# Altium PCB PCB_LogNController-v1.1.PcbDoc (part 1 of 3)
Units mil, origin at the board's own origin, x right, y up, seen from the top; angles counter-clockwise.
Board outline 7018 x 7081 mil, 2 copper layers (Top Layer, Bottom Layer), stack 61.811 mil thick; 172 components, 114 nets, 574 pads, 361 vias.
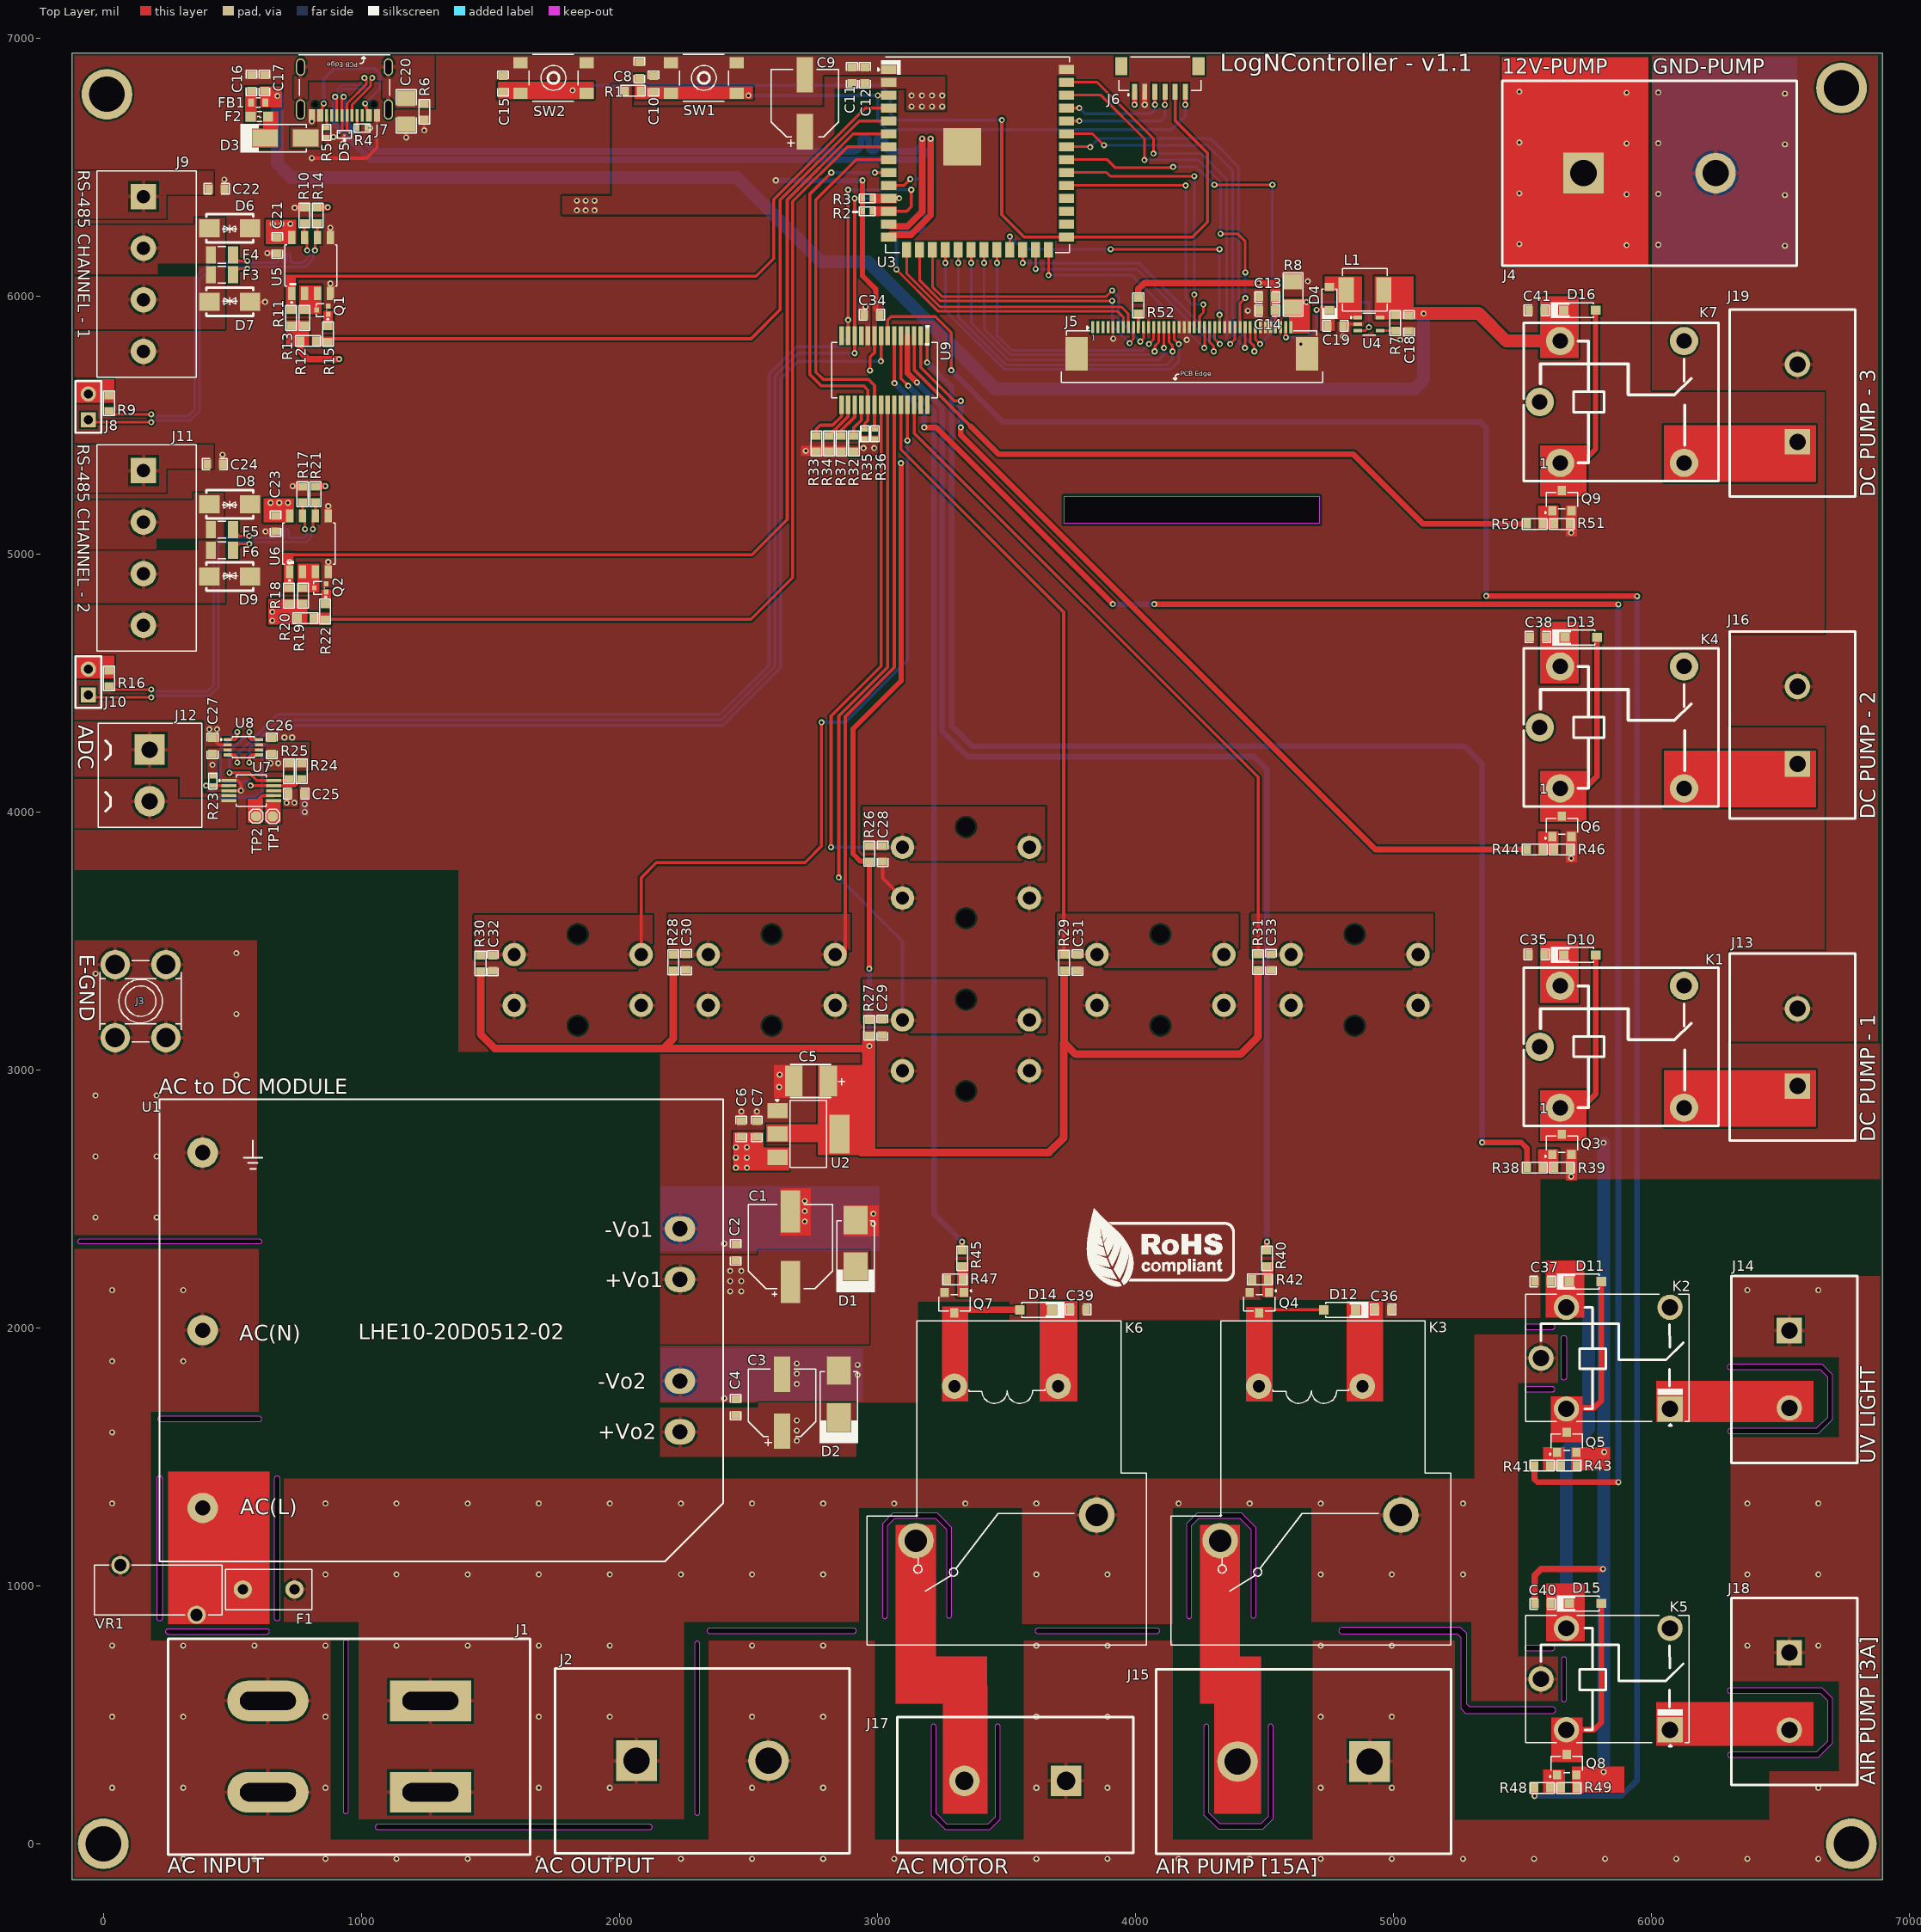
[diagram p0: Top Layer view]
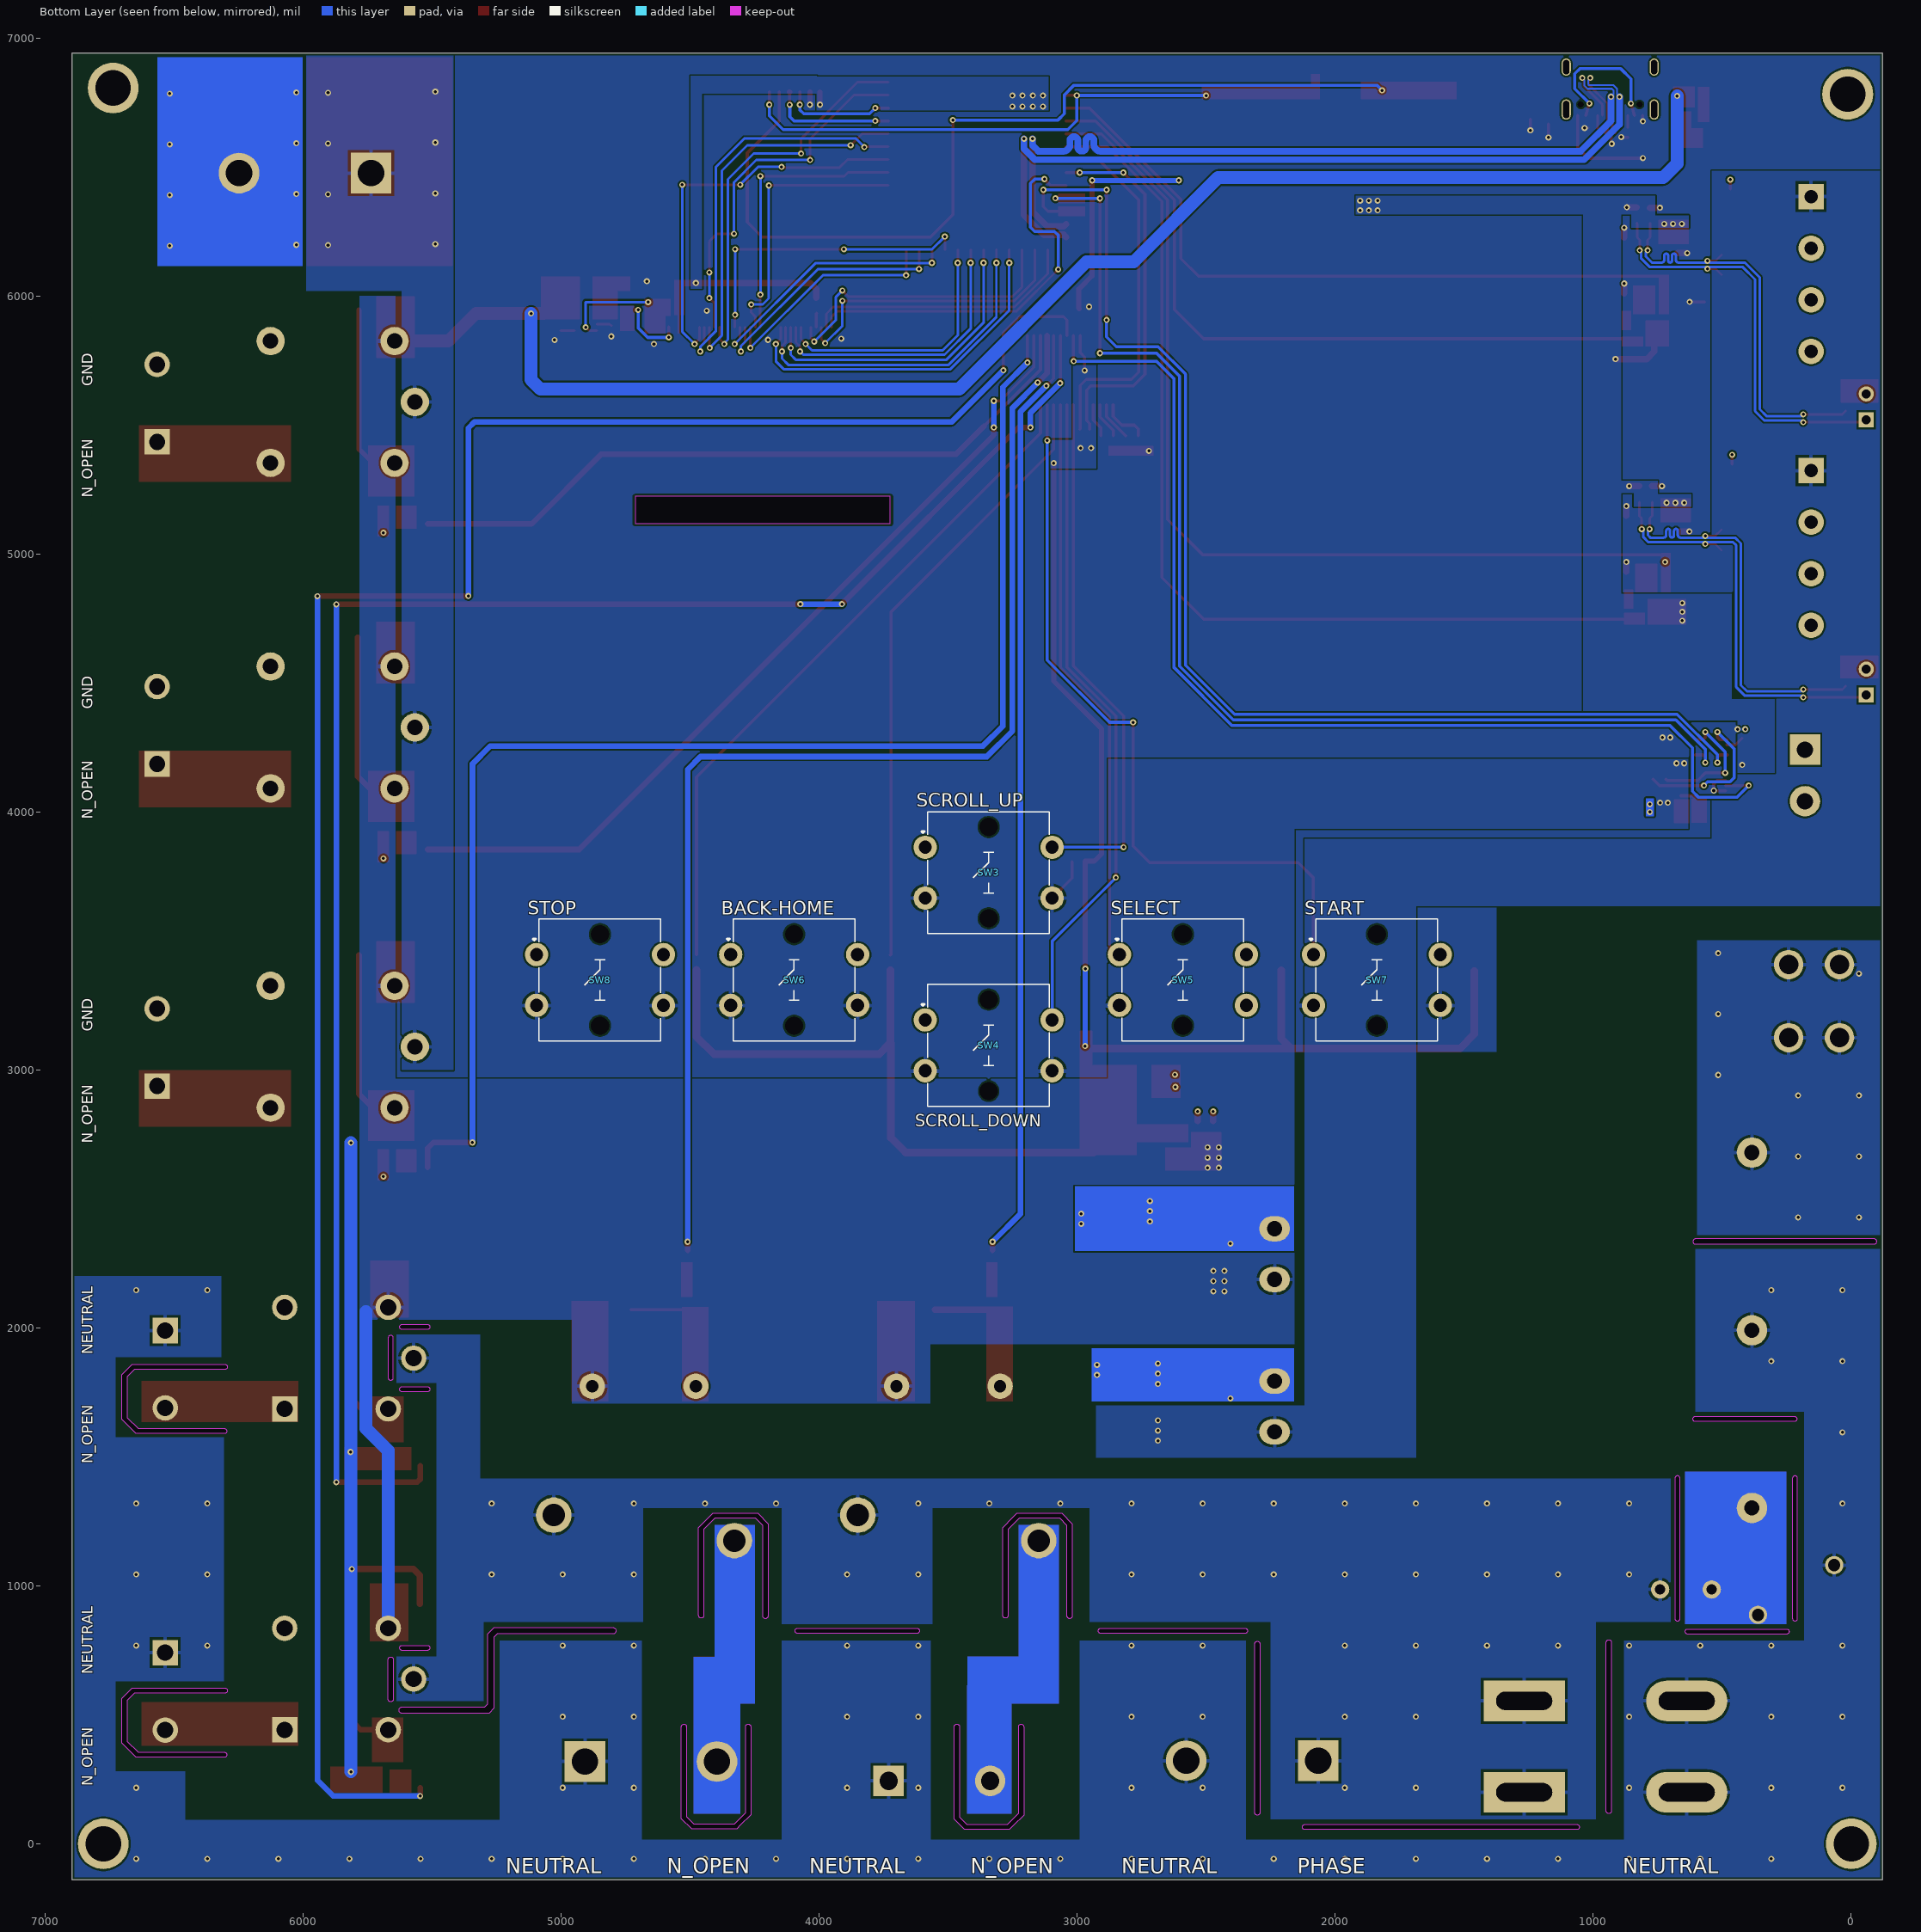
[diagram p1: Bottom Layer view, seen from below]
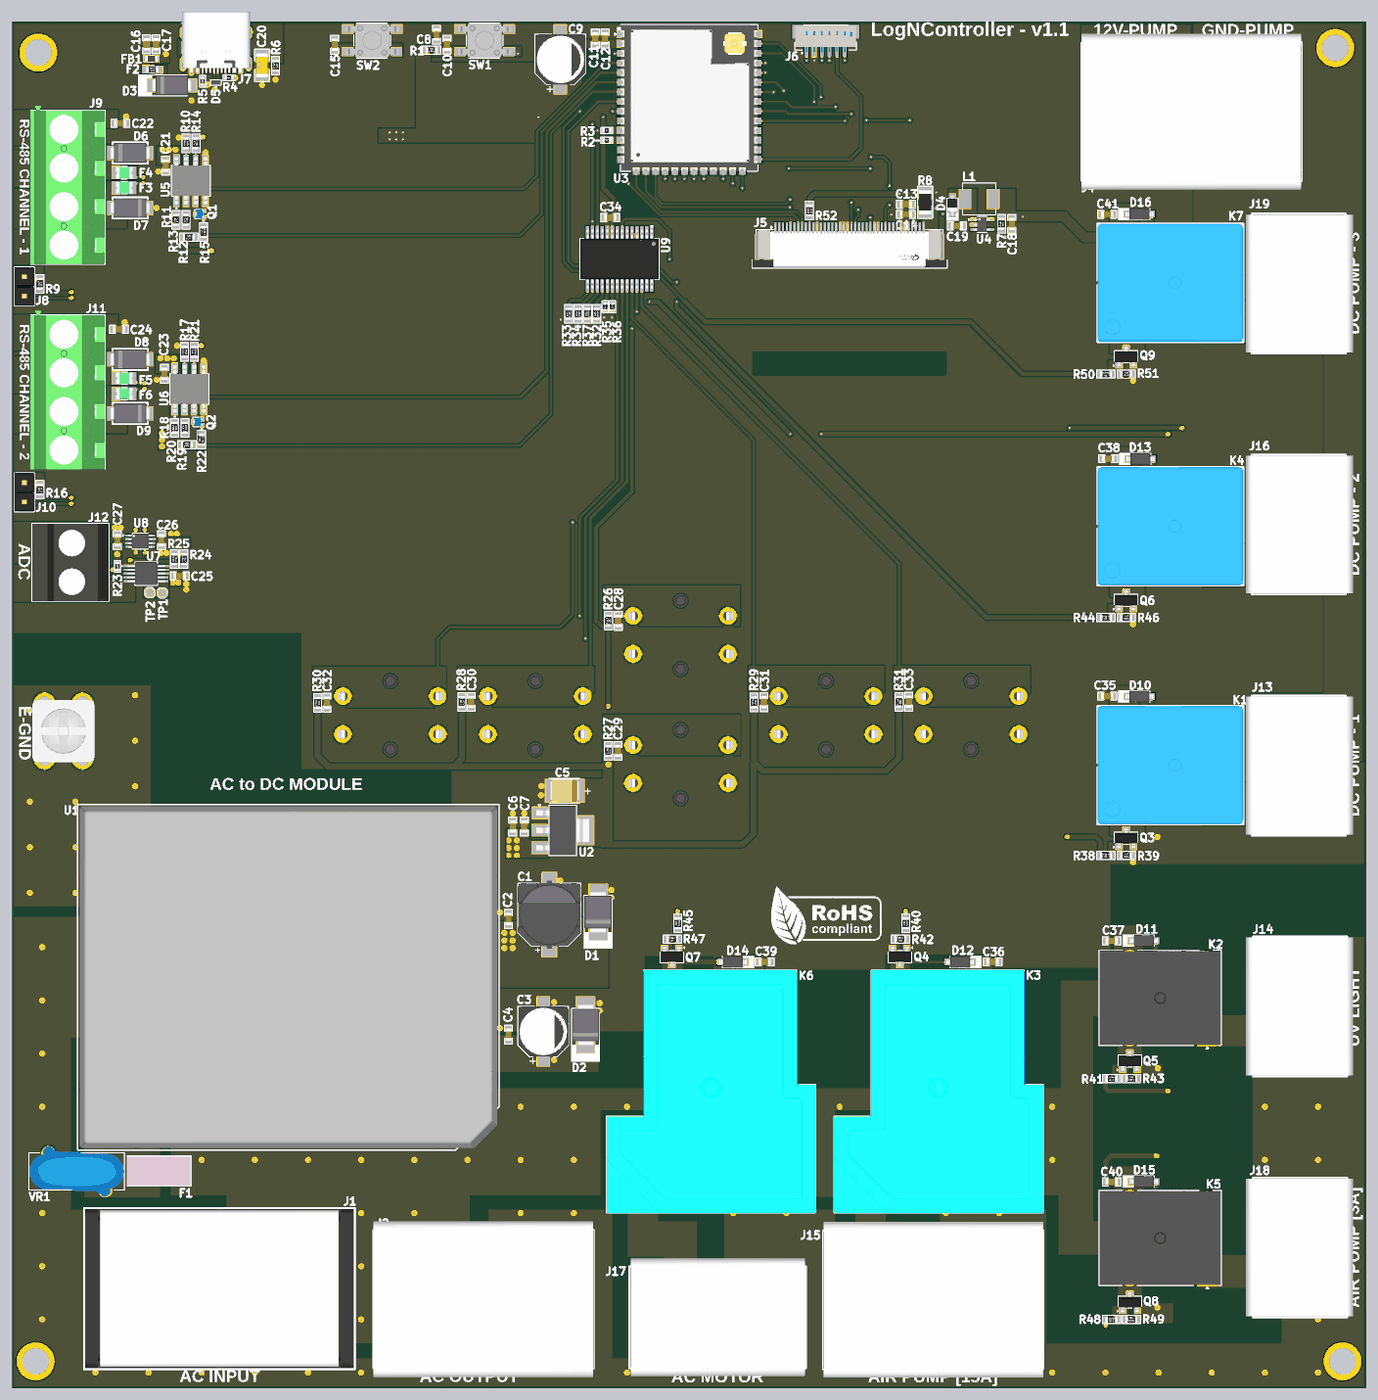
[diagram p3: 3D render of the assembled board from above, using the file's embedded part models]
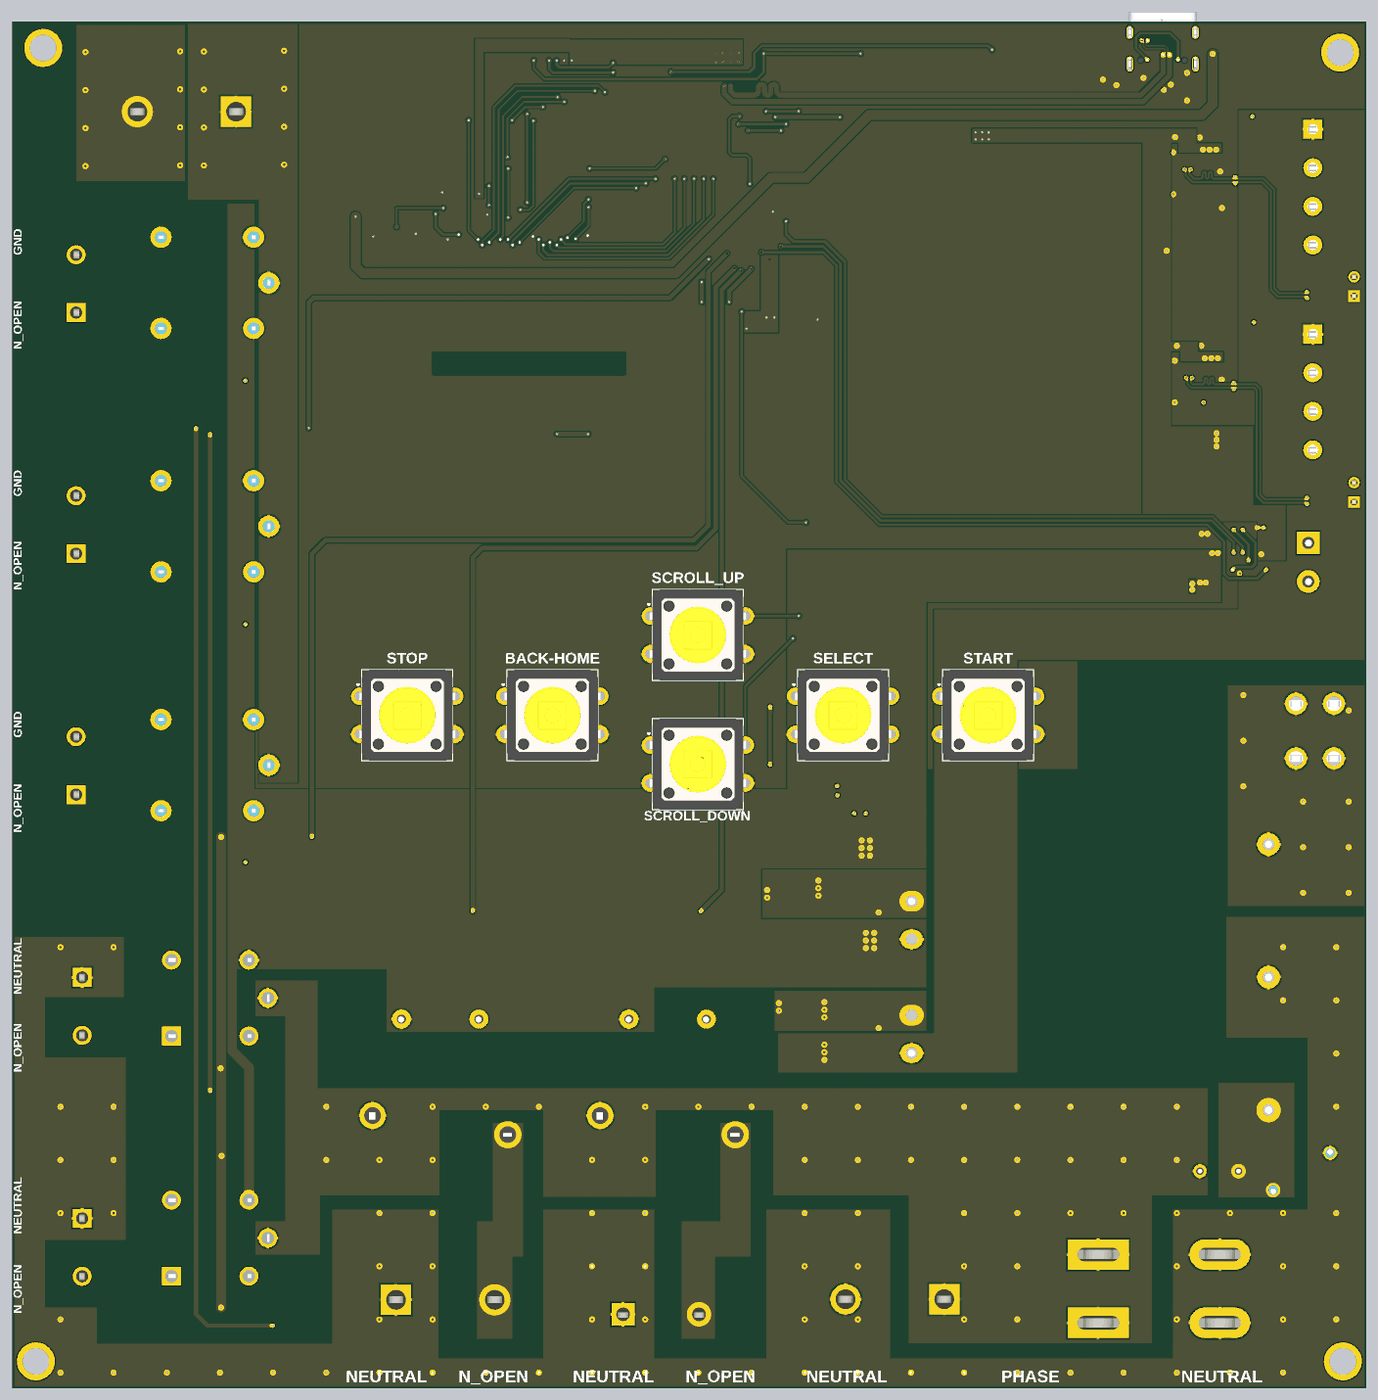
[diagram p4: 3D render of the assembled board from below, using the file's embedded part models]

## Layer stack, top to bottom
Top Solder: solder mask 0.394, Solder Resist, Dk 3.5
Top Layer: signal copper 1.378
Dielectric 1: core 59.055, FR-4, Dk 4.8
Bottom Layer: signal copper 1.378
Bottom Solder: solder mask 0.394, Solder Resist, Dk 3.5

## Board outline
-121,-139 6897,-139 6897,6942 -121,6942
cut-out: 2340.52,825.82 ccw(c2350.52,825.82) 2350.52,815.82 2909,815.82 ccw(c2909,825.82) 2919,825.82 ccw(c2909,825.82) 2909,835.82 2350.52,835.82 ccw(c2350.52,825.82)
cut-out: 218.15,863.91 cw(c218.15,873.91) 208.15,873.91 208.15,1416.7 cw(c218.15,1416.7) 218.15,1426.7 cw(c218.15,1416.7) 228.15,1416.7 228.15,873.91 cw(c218.15,873.91)
cut-out: 3020,883 ccw(c3030,883) 3030,873 ccw(c3030,883) 3040,883 3039.84,883 3039.84,1233.52 3067.89,1261.57 3226.04,1261.57 3268.84,1218.76 3268.84,885 ccw(c3278.84,885) 3278.84,875 ccw(c3278.84,885) 3288.84,885 3288.84,1226.29 3248.33,1266.8 3233.57,1281.57 3060.35,1281.57 3019.84,1241.05
cut-out: 3228.16,118.24 3228.16,454 ccw(c3218.16,454) 3218.16,464 ccw(c3218.16,454) 3208.16,454 3208.16,110.71 3248.67,70.2 3263.43,55.43 3436.65,55.43 3477.16,95.95 3477.16,454 3477,454 ccw(c3467,454) 3467,464 ccw(c3467,454) 3457,454 3457.16,454 3457.16,103.48 3429.11,75.43 3270.96,75.43
cut-out: 4286.16,120.24 4286.16,454 ccw(c4276.16,454) 4276.16,464 ccw(c4276.16,454) 4266.16,454 4266.16,112.71 4306.67,72.2 4321.43,57.43 4494.65,57.43 4535.16,97.95 4535.16,456 4535,454 ccw(c4525,454) 4525,464 ccw(c4525,454) 4515,454 4515.16,456 4515.16,105.48 4487.11,77.43 4328.96,77.43
cut-out: 4199.39,883 ccw(c4209.39,883) 4209.39,873 ccw(c4209.39,883) 4219.39,883 4219.23,883 4219.23,1233.52 4247.28,1261.57 4405.43,1261.57 4448.23,1218.76 4448.23,885 ccw(c4458.23,885) 4458.23,875 ccw(c4458.23,885) 4468.23,885 4468.23,1226.29 4427.72,1266.8 4412.96,1281.57 4239.74,1281.57 4199.23,1241.05
cut-out: 5510.09,2003.79 ccw(c5520.09,2003.79) 5520.09,1993.79 5617.94,1993.79 5617.31,1993.81 ccw(c5617.31,2003.77) 5627.28,2003.77 5627.28,2003.8 ccw(c5617.31,2003.8) 5617.31,2013.77 5617.94,2013.94 5520.09,2013.94 5520.09,2013.79 ccw(c5520.09,2003.79)
cut-out: 673.85,863.91 cw(c673.85,873.91) 663.85,873.91 663.85,1416.7 cw(c673.85,1416.7) 673.85,1426.7 cw(c673.85,1416.7) 683.85,1416.7 683.85,873.91 cw(c673.85,873.91)
cut-out: 5510.09,759.62 ccw(c5520.09,759.62) 5520.09,749.62 5617.94,749.62 5617.31,749.64 ccw(c5617.31,759.61) 5627.28,759.61 5627.28,759.64 ccw(c5617.31,759.64) 5617.31,769.6 5617.94,769.77 5520.09,769.77 5520.09,769.62 ccw(c5520.09,759.62)
cut-out: 5520.09,1752.09 5617.94,1752.09 5617.31,1752.26 ccw(c5617.31,1762.23) 5627.28,1762.23 5627.28,1762.26 ccw(c5617.31,1762.26) 5617.31,1772.22 5617.94,1772.24 5520.09,1772.24 ccw(c5520.09,1762.24) 5510.09,1762.24 ccw(c5520.09,1762.24)
cut-out: 6297.24,345.16 ccw(c6307.24,345.16) 6307.24,335.16 6648.53,335.16 6689.04,375.67 6703.8,390.43 6703.8,563.65 6663.29,604.16 6305.24,604.16 6305.24,604 ccw(c6305.24,594) 6295.24,594 ccw(c6305.24,594) 6305.24,584 6305.24,584.16 6655.76,584.16 6683.8,556.12 6683.8,397.96 6641,355.16 6307.24,355.16 ccw(c6307.24,345.16)
cut-out: 6297.24,1600 ccw(c6307.24,1600) 6307.24,1590 6648.53,1590 6689.04,1630.51 6703.8,1645.27 6703.8,1818.49 6663.29,1859 6305.24,1859 6305.24,1858.84 ccw(c6305.24,1848.84) 6295.24,1848.84 ccw(c6305.24,1848.84) 6305.24,1838.84 6305.24,1839 6655.76,1839 6683.8,1810.96 6683.8,1652.8 6641,1610 6307.24,1610 ccw(c6307.24,1600)
cut-out: 5249.01,813.3 5261.53,800.78 5261.53,526.82 5262.27,525.04 5281.16,506.15 5282.94,505.41 5617.94,505.41 5619.14,505.72 ccw(c5617.31,518.06) 5629.79,518.06 5629.79,518.09 ccw(c5617.31,518.09) 5618.59,530.51 5617.94,530.59 5296.83,530.59 5285.31,542.12 5285.31,813.82 5284.57,815.6 5262.57,837.6 5260.79,838.33 4801.56,838.33 ccw(c4801.56,825.82) 4789.05,825.82 ccw(c4801.56,825.82) 4801.56,813.3
cut-out: 3612.17,825.82 ccw(c3622.17,825.82) 3622.17,815.82 4084.66,815.82 ccw(c4084.66,825.82) 4094.66,825.82 ccw(c4084.66,825.82) 4084.66,835.82 3622.17,835.82 ccw(c3622.17,825.82)
cut-out: 2292.44,121.12 ccw(c2302.44,121.12) 2302.44,111.12 ccw(c2302.44,121.12) 2312.44,121.12 2312.44,775.16 ccw(c2302.44,775.16) 2302.44,785.16 ccw(c2302.44,775.16) 2292.44,775.16
cut-out: 1054,65 ccw(c1064,65) 1064,55 2118.05,55 ccw(c2118.05,65) 2128.05,65 ccw(c2118.05,65) 2118.05,75 1064,75 ccw(c1064,65)
cut-out: 930,127.12 ccw(c940,127.12) 940,117.12 ccw(c940,127.12) 950,127.12 950,781.17 ccw(c940,781.17) 940,791.17 ccw(c940,781.17) 930,781.17
cut-out: 251,813 634,813 ccw(c634,823) 644,823 ccw(c634,823) 634,833 251,833 ccw(c251,823) 241,823 ccw(c251,823)
cut-out: 221,1637 604,1637 ccw(c604,1647) 614,1647 ccw(c604,1647) 604,1657 221,1657 ccw(c221,1647) 211,1647 ccw(c221,1647)
cut-out: -89,2325 cw(c-89,2335) -99,2335 cw(c-89,2335) -89,2345 604,2345 cw(c604,2335) 614,2335 cw(c604,2335) 604,2325
cut-out: 5651.94,560.48 ccw(c5661.94,560.48) 5661.94,550.48 ccw(c5661.94,560.48) 5671.94,560.48 5671.94,714.53 ccw(c5661.94,714.53) 5661.94,724.53 ccw(c5661.94,714.53) 5651.94,714.53
cut-out: 5671.94,1807.34 cw(c5661.94,1807.34) 5661.94,1797.34 cw(c5661.94,1807.34) 5651.94,1807.34 5651.94,1961.39 cw(c5661.94,1961.39) 5661.94,1971.39 cw(c5661.94,1961.39) 5671.94,1961.39
cut-out: 3725.03,5118.5 3725.03,5223.5 4714,5223.5 4714,5118.5

## Design rules (kind name [scope] priority, off if disabled: settings)
BoardOutlineClearance [All] p1: gap=0 ignorepadtopadclearanceinfootprint=FALSE except(10: Via-OutlineEdge Fill-OutlineEdge Fill-CutoutEdge Poly-OutlineEdge Poly-CutoutEdge Region-OutlineEdge Region-CutoutEdge)
Clearance [All] p1: gap=7 ignorepadtopadclearanceinfootprint=FALSE except(0: SMDPad-THPad SMDPad-Hole; 4: Arc-SMDPad Track-SMDPad SMDPad-SMDPad)
ComponentClearance [All] p1: gap=5 collisioncheckmode=3 verticalgap=5 showdistances=FALSE
DiffPairsRouting DiffPairsRouting_RS485 [InDifferentialPairClass('RS485_Lines')] p1: maxlimit=8 minlimit=8 mostfreqgap=8 toplayer_minwidth=10 toplayer_maxwidth=10 toplayer_prefwidth=10 bottomlayer_minwidth=10 bottomlayer_maxwidth=10 bottomlayer_prefwidth=10 impedanceprofiledriven=TRUE impedanceprofileid={C0F69817-CA74-47E5-B65F-B62474643589} impedanceprofilevalue=120.000000 maxuncoupledlength=500
DiffPairsRouting [InDifferentialPairClass('USB_PROGRAM_LINES')] p2: maxlimit=7 minlimit=7 mostfreqgap=7 toplayer_minwidth=7 toplayer_maxwidth=26 toplayer_prefwidth=26 bottomlayer_minwidth=7 bottomlayer_maxwidth=26 bottomlayer_prefwidth=26 impedanceprofiledriven=TRUE impedanceprofileid={13F691BD-BDFD-4AD8-8890-2CF89E266969} impedanceprofilevalue=90.000000 maxuncoupledlength=500
Height [All] p1: minheight=0 maxheight=2000 prefheight=500
HoleSize [All] p1: absolutevalues=TRUE maxlimit=10000 minlimit=1 maxpercent=80.000 minpercent=20.000
HoleToHoleClearance [All] p1: gap=2 allowstackedmicrovias=TRUE
MatchedLengths "Schematic Matched Net Lengths_1" [InNetClass('RS485')] p1: tolerance=50 checknetsindiffpair=TRUE checkdiffpairvsdiffpair=FALSE checkxsignals=FALSE checkothers=FALSE
MatchedLengths "Schematic Matched Net Lengths" [InNetClass('USB_PROGRAM')] p2: tolerance=50 checknetsindiffpair=TRUE checkdiffpairvsdiffpair=FALSE checkxsignals=FALSE checkothers=FALSE
MaxMinImpedance "Schematic Impedance Constraint_1" [InNetClass('RS485')] p1: minimum=120.0 maximum=120.0
MaxMinImpedance "Schematic Impedance Constraint" [InNetClass('USB_PROGRAM')] p2: minimum=85.00 maximum=90.00
MinimumSolderMaskSliver [All] p1: minsoldermaskwidth=0
PolygonConnect [All] p1: thpad.connectstyle=Relief thpad.reliefconductorwidth=15 thpad.reliefentries=4 thpad.polygonreliefangle="90 Angle" thpad.airgapwidth=10 smdpad.connectstyle=Direct smdpad.reliefconductorwidth=10 smdpad.reliefentries=4 smdpad.polygonreliefangle="90 Angle" smdpad.airgapwidth=10 via.connectstyle=Direct via.reliefconductorwidth=10 via.reliefentries=4 via.polygonreliefangle="90 Angle" via.airgapwidth=10
RoutingVias [All] p1: holewidth=11.81 width=23.62 viastyle="Through Hole" minholewidth=11.81 minwidth=23.62 maxholewidth=11.81 maxwidth=23.62
SilkToSilkClearance [All] p1: silktosilkclearance=0
SilkToSolderMaskClearance [IsPad] p1: minsilkscreentomaskgap=0 clearancetoexposedcopper=TRUE
SolderMaskExpansion [All] p1: expansion=4 istentingtop=FALSE
UnRoutedNet [All] p1: checkbadconnections=TRUE
Width [All] p1: maxlimit=100 minlimit=10 preferedwidth=15 minimp=50.000000 maximp=50.000000 favimp=50.000000
21 further rules are at their usual default settings.

## Classes and differential pairs
differential pair class RS485_Lines: RS485-1 RS485-2
net class RS485: RS485-1_N RS485-1_P RS485-2_N RS485-2_P
differential pair class USB_PROGRAM_LINES: USB_D
net class USB_PROGRAM: USB_D_N USB_D_P
component class U_Sensor-Comms-Sheet: C21 C22 C23 C24 D6 D7 D8 D9 F3 F4 F5 F6 J8 J9 J10 J11 Q1 Q2 R9 R10 R11 R12 R13 R14 R15 R16 R17 R18 R19 R20 R21 R22 U5 U6
component class U_Relay-Sheet: C35 C36 C37 C38 C39 C40 C41 D10 D11 D12 D13 D14 D15 D16 J13 J14 J15 J16 J17 J18 J19 K1 K2 K3 K4 K5 K6 K7 Q3 Q4 Q5 Q6 Q7 Q8 Q9 R38 R39 R40 R41 R42 R43 R44 R45 R46 R47 R48 R49 R50 R51
component class U_Power-Sheet: C1 C2 C3 C4 C5 C6 C7 D1 D2 F1 J1 J2 J3 J4 U1 U2 VR1
component class U_IO-Expander-Sheet: C34 R32 R33 R34 R35 R36 R37 U9
component class U_Controller-Sheet: C8 C9 C10 C11 C12 C13 C14 C15 C16 C17 C18 C19 C20 D3 D4 D5 F2 FB1 J5 J6 J7 L1 R1 R2 R3 R4 R5 R6 R7 R8 R52 SW1 SW2 U3 U4
component class U_Buttons-Sheet: C28 C29 C30 C31 C32 C33 R26 R27 R28 R29 R30 R31 SW3 SW4 SW5 SW6 SW7 SW8
component class U_ADC-Sheet: C25 C26 C27 J12 R23 R24 R25 TP1 TP2 U7 U8
differential pair RS485-2: +RS485-2_P -RS485-2_N
differential pair RS485-1: +RS485-1_P -RS485-1_N
differential pair USB_D: +USB_D_P -USB_D_N

## Components (designator, comment, footprint, x,y, rotation, side; value= is the part's Value field where it differs from the comment)
C1 "100uF" 25SVPF100M. 2663.76,2315.17 r90 top locked
C2 "100nF" Cap-0603 2451.37,2293 r270 top locked
C3 "47uF" RVT1H470M0607 2631.37,1710.09 r90 top locked
C4 "100nF" Cap-0603 2451.37,1693 r270 top locked
C5 "22uF" Case-B 2743.37,2957 r180 top locked
C6 "22uF" Cap-0603 2473.37,2772 r270 top locked
C7 "100nF" Cap-0603 2533.37,2772 r270 top locked
C8 "1uF" Cap-0603 2078,6876 r270 top locked
C9 "47uF" RVT1H470M0607 2720,6748 r90 top locked
C10 "100nF" Cap-0603 2133,6824 r90 top locked
C11 "22uF" Cap-0603 2902,6856 r270 top locked
C12 "100nF" Cap-0603 2952,6856 r270 top locked
C13 "4.7uF" Cap-0603 4512,5997 r0 top locked
C14 "100nF" Cap-0603 4512,5944 r0 top locked
C15 "100nF" Cap-0603 1550,6824 r90 top locked
C16 "100nF" Cap-0603 575,6826 r270 top locked
C17 "100nF" Cap-0603 625,6826 r270 top locked
C18 "4.7uF" Cap-0603 5061,5894.74 r90 top locked
C19 "1uF" Cap-0603 4776,5884.74 r180 top locked
C20 "4.7nF" Cap-1206 1174,6717 r90 top locked
C21 "100nF" Cap-0603 674,6197 r270 top locked
C22 "100nF" Cap-0603 439,6416 r180 top locked
C23 "100nF" Cap-0603 668,5118 r270 top locked
C24 "100nF" Cap-0603 432,5349 r180 top locked
C25 "100nF" Cap-0603 747.51,4071 r180 top locked
C26 "100nF" Cap-0603 652.51,4256 r90 top locked
C27 "100nF" Cap-0603 423.51,4256 r90 top locked
C28 "100nF" Cap-0603 3021,3838 r270 top locked
C29 "100nF" Cap-0603 3019,3164 r270 top locked
C30 "100nF" Cap-0603 2259,3418 r270 top locked
C31 "100nF" Cap-0603 3776,3417 r270 top locked
C32 "100nF" Cap-0603 1510,3414 r270 top locked
C33 "100nF" Cap-0603 4526.67,3419 r270 top locked
C34 "100nF" Cap-0603 2979,5928 r180 top locked
C35 "100nF" Cap-0603 5556,3447.87 r180 top locked
C36 "100nF" Cap-0603 4961,2071 r0 top locked
C37 "100nF" Cap-0603 5579,2179.87 r180 top locked
C38 "100nF" Cap-0603 5561,4678.87 r180 top locked
C39 "100nF" Cap-0603 3780,2071 r0 top locked
C40 "100nF" Cap-0603 5579,930 r180 top locked
C41 "100nF" Cap-0603 5556,5944.87 r180 top locked
D1 "SMBJ7.0A" SMB_ 2916.37,2328 r270 top locked
D2 "SMBJ20A" SMB_ 2851.37,1743.55 r270 top locked
D3 "SS24A" SMA 705.74,6613 r0 top locked
D4 "NSR0240HT1G" SOD-323 4753,5990.74 r90 top locked value=4pF
D5 "ESD122DMYR" X2-SON-3(0.6x1.3). 934.68,6628.08 r90 top locked
D6 "SMAJ12CA" "SMA Bi Directional" 490,6263 r0 top locked
D7 "SMAJ12CA" "SMA Bi Directional" 490,5978 r180 top locked
D8 "SMAJ12CA" "SMA Bi Directional" 490,5193 r0 top locked
D9 "SMAJ12CA" "SMA Bi Directional" 490,4913 r180 top locked
D10 "1N4148W-7-F" SOD-123 5722.99,3445.87 r180 top locked value=2pF
D11 "1N4148W-7-F" SOD-123 5745,2179.87 r180 top locked value=2pF
D12 "1N4148W-7-F" SOD-123 4792.86,2070 r0 top locked value=2pF
D13 "1N4148W-7-F" SOD-123 5727.99,4676.87 r180 top locked value=2pF
D14 "1N4148W-7-F" SOD-123 3614.87,2070 r0 top locked value=2pF
D15 "1N4148W-7-F" SOD-123 5745.03,932 r180 top locked value=2pF
D16 "1N4148W-7-F" SOD-123 5722.99,5945.87 r180 top locked value=2pF
F1 "2010T1A250V" 2010T1A250V 641,986 r180 top locked
F2 "BSMD0603L-100" fuse-0603 605,6696 r180 top locked
F3 "SMD0805P020TF" Fuse-0805 460,6160 r180 top locked
F4 "SMD0805P020TF" Fuse-0805 460,6083 r180 top locked
F5 "SMD0805P020TF" Fuse-0805 460,5095 r180 top locked
F6 "SMD0805P020TF" Fuse-0805 460,5015 r180 top locked
FB1 "BLM18SG121TN1D" "IND-0603 (1608 Metric)" 600,6751 r0 top locked
J1 "KF88SA-16.0-2P" KF88SA-16.0-2P 953,377 r180 top locked
J2 "KF78C-13.0-2P" KF78C-13.0-2P 2322.49,322.16 r0 top locked
J3 "T44001" T44001 144.43,3267 r0 top locked
J4 "KF78C-13.0-2P" KF78C-13.0-2P 5994,6477 r0 top locked
J5 "AFC07-S40ECA-00" AFC07-S40ECA-00 4219.51,5828.48 r0 top locked
J6 "Voltlink Target" "Voltlink Target" 4096,6842 r0 top locked
J7 "TYPE-C-31-M-12" TYPE-C-31-M-12_ 934.72,6794.49 r180 top locked
J8 "X6511WV-02H-C60D30" HDR1X2_ -58,5521 r90 top locked
J9 "1715747" 1715747 155.71,6086 r270 top locked
J10 "X6511WV-02H-C60D30" HDR1X2_ -58,4454 r90 top locked
J11 "1715747" 1715747 155.71,5024 r270 top locked
J12 "DB128L-5.08-2P-BK-S" DB128L-5.08-2P-BK-S 179.51,4142 r270 top locked
J13 "KF28C-7.62-2P" KF28C-7.62-2P 6567.5,3087.68 r90 top locked
J14 "KF28C-7.62-2P" KF28C-7.62-2P 6536,1839.84 r270 top locked
J15 "KF78C-13.0-2P" KF78C-13.0-2P 4652.87,319 r180 top locked
J16 "KF28C-7.62-2P" KF28C-7.62-2P 6567.5,4336.52 r90 top locked
J17 "KF58C-10.0-2P" KF58C-10.0-2P 3535,244 r180 top locked
J18 "KF28C-7.62-2P" KF28C-7.62-2P 6536,591 r270 top locked
J19 "KF28C-7.62-2P" KF28C-7.62-2P 6567.5,5585.36 r90 top locked
K1 "SRD-05VDC-SL-C" SRD-05VDC-SL-C 5848,3090.07 r0 top locked
K2 "SRA-05VDC-CL" SRA-05VDC-CL 6073.13,1686.16 r0 top locked
K3 "SLA-05VDC-SL-A" SLA-05VDC-SL-A 4679.87,1474.8 r180 top locked
K4 "SRD-05VDC-SL-C" SRD-05VDC-SL-C 5848,4328.07 r0 top locked
K5 "SRA-05VDC-CL" SRA-05VDC-CL 6073.13,442 r0 top locked
K6 "SLA-05VDC-SL-A" SLA-05VDC-SL-A 3500.48,1474.8 r180 top locked
K7 "SRD-05VDC-SL-C" SRD-05VDC-SL-C 5848,5589.87 r0 top locked
L1 "4.7uH" MWSA0402S-4R7MT 4891,6024.74 r180 top locked
Q1 "MMBT3904M" SOT-723 849.64,5946 r90 top locked
Q2 "MMBT3904M" SOT-723 840.64,4869 r90 top locked
Q3 "MMBT2222A-7-F" SOT-23 5654,2711.5 r0 top locked
Q4 "MMBT2222A-7-F" SOT-23 4480.87,2098 r180 top locked
Q5 "MMBT2222A-7-F" SOT-23 5673,1556.5 r0 top locked
Q6 "MMBT2222A-7-F" SOT-23 5654,3944.5 r0 top locked
Q7 "MMBT2222A-7-F" SOT-23 3298.87,2098 r180 top locked
Q8 "MMBT2222A-7-F" SOT-23 5673,306.63 r0 top locked
Q9 "MMBT2222A-7-F" SOT-23 5654,5207 r0 top locked
R1 "10K" Res-0603 2053,6796 r180 top locked
R2 "4.7K" Res-0402 2961.5,6329 r180 top locked
R3 "4.7K" Res-0402 2961.5,6379 r180 top locked
R4 "5.1K" Res-0402 1003,6652 r0 top locked
R5 "5.1K" Res-0402 866,6634.5 r270 top locked
R6 "1M" Res-0603 1244,6715 r90 top locked
R7 "10K" Res-0603 5008,5895.74 r90 top locked
R8 "6.2R" Res-1206 4612,6007 r270 top locked
R9 "120R" Res-0603 22,5585 r90 top locked
R10 "4.7K" Res-0603 780,6313 r90 top locked
R11 "4.7K" Res-0603 728,5916 r90 top locked
R12 "4.7K" Res-0603 794,5826 r180 top locked
R13 "4.7K" Res-0603 780,5916 r270 top locked
R14 "4.7K" Res-0603 831,6313 r270 top locked
R15 "4.7K" Res-0603 871,5853 r270 top locked
R16 "120R" Res-0603 22,4518 r90 top locked
R17 "4.7K" Res-0603 772,5232 r90 top locked
R18 "4.7K" Res-0603 720,4839 r90 top locked
R19 "4.7K" Res-0603 784,4751 r180 top locked
R20 "4.7K" Res-0603 774,4839 r270 top locked
R21 "4.7K" Res-0603 822,5232 r270 top locked
R22 "4.7K" Res-0603 860,4777 r270 top locked
R23 "4.7K" Res-0402 424.51,4120.5 r90 top locked
R24 "10K" Res-0603 768.51,4158 r90 top locked
R25 "10K" Res-0603 719.51,4158 r90 top locked
R26 "10K" Res-0603 2970,3839 r90 top locked
R27 "10K" Res-0603 2970,3163 r90 top locked
R28 "10K" Res-0603 2210,3417 r90 top locked
R29 "10K" Res-0603 3725,3416 r90 top locked
R30 "10K" Res-0603 1462,3413 r90 top locked
R31 "10K" Res-0603 4476.67,3418 r90 top locked
R32 "10K" Res-0603 2909.15,5429 r270 top locked
R33 "10K" Res-0603 2763.87,5429 r270 top locked
R34 "10K" Res-0603 2812.29,5429 r270 top locked
R35 "4.7K" Res-0402 2952.57,5466 r270 top locked
R36 "4.7K" Res-0402 2991,5466 r270 top locked
R37 "10K" Res-0603 2860.72,5429 r270 top locked
R38 "470R" Res-0603 5549,2621.87 r0 top locked
R39 "10K" Res-0603 5654,2621.87 r180 top locked
R40 "470R" Res-0603 4510.87,2270 r270 top locked
R41 "470R" Res-0603 5578,1466 r0 top locked
R42 "10K" Res-0603 4483.87,2188 r0 top locked
R43 "10K" Res-0603 5681,1466 r180 top locked
R44 "470R" Res-0603 5549,3854.87 r0 top locked
R45 "470R" Res-0603 3329,2270 r270 top locked
R46 "10K" Res-0603 5654,3854.87 r180 top locked
R47 "10K" Res-0603 3301.37,2188 r0 top locked
R48 "470R" Res-0603 5578,217 r0 top locked
R49 "10K" Res-0603 5681,217 r180 top locked
R50 "470R" Res-0603 5549,5117 r0 top locked
R51 "10K" Res-0603 5654,5116.87 r180 top locked
R52 "10K" Res-0603 4012,5964 r90 top locked
SW1 "TS-1109S-C-B" TS-1109S-C-B 2328,6846 r180 top locked
SW2 "TS-1109S-C-B" TS-1109S-C-B 1745,6846 r180 top locked
SW3 "B3F-4055" B3F-4055 3344,3765 r0 bottom locked
SW4 "B3F-4055" B3F-4055 3344,3095.57 r0 bottom locked
SW5 "B3F-4055" B3F-4055 2591,3349 r0 bottom locked
SW6 "B3F-4055" B3F-4055 4098,3349 r0 bottom locked
SW7 "B3F-4055" B3F-4055 1839,3349 r0 bottom locked
SW8 "B3F-4055" B3F-4055 4850.67,3349 r0 bottom locked
TP1 "TEST POINT 0.5mm Dia" "Test-point - 0.5mm" 656.51,3983 r90 top locked
TP2 "TEST POINT 0.5mm Dia" "Test-point - 0.5mm" 592.51,3984 r90 top locked
U1 "LHE10-20D0512-02" LHE10-20D0512-02 1310.37,1991 r0 top locked
U2 "AMS1117-3.3" "SOT- 223" 2733.37,2752 r270 top locked
U3 "ESP32-S3-WROOM-1U-N16R8" "41-SMD UFL Module" 3388.8,6529.61 r0 top locked
U4 "TPS61169DCKR" SC70-5 4906.31,5891.74 r0 top locked
U5 "SP3485EIM/TR" SOP-8 805,6119.27 r90 top locked
U6 "SP3485EIM/TR" SOP-8 797,5040 r90 top locked
U7 "ADS1115IDGSR" VSSOP-10 573.51,4083 r0 top locked
U8 "TXS0102DCUR" VSSOP-8(3.1x2.1) 542.51,4251 r0 top locked
U9 "MCP23017T-E/SS" SSOP-28-208mil 3027.87,5713 r270 top locked
VR1 "V300LT20AP" V300LT20AP 214,984 r0 top locked

## Footprints (in the part's own frame and the unit in brackets; to place one, negate y for a bottom-side part, rotate by r counter-clockwise, add the part's x,y. Pads: shape width x height; smd on the part's side, far side on the other; paste and mask are expansions set on the pad)
25SVPF100M. [mm]
  rect 4.15x1.9 smd: 1(-3.475,0) 2(3.475,0)
  silkscreen extent -4.9,-4.15 4.15,4.15, body extent -4.5,-4.15 4.5,4.15, height 6.9
"41-SMD UFL Module" [mm]
  rect 1.5x0.9 smd: 1(-8.75,8.88) 2(-8.75,7.61) 3(-8.75,6.34) 4(-8.75,5.07) 5(-8.75,3.8) 6(-8.75,2.53) 7(-8.75,1.26) 8(-8.75,-0.01) 9(-8.75,-1.28) 10(-8.75,-2.55) 11(-8.75,-3.82) 12(-8.75,-5.09) 13(-8.75,-6.36) 14(-8.75,-7.63) 27(8.75,-7.63) 28(8.75,-6.36) 29(8.75,-5.09) 30(8.75,-3.82) 31(8.75,-2.55) 32(8.75,-1.28) 33(8.75,-0.01) 34(8.75,1.26) 35(8.75,2.53) 36(8.75,3.8) 37(8.75,5.07) 38(8.75,6.34) 39(8.75,7.61) 40(8.75,8.88)
  rect 0.9x1.5 smd: 15(-6.98,-8.88) 16(-5.71,-8.88) 17(-4.44,-8.88) 18(-3.17,-8.88) 19(-1.9,-8.88) 20(-0.63,-8.88) 21(0.64,-8.88) 22(1.91,-8.88) 23(3.18,-8.88) 24(4.45,-8.88) 25(5.72,-8.88) 26(6.99,-8.88)
  rect 3.7x3.7 smd: 41(-1.5,1.26)
  silkscreen extent -9.8,-9.17 9.05,10.11, body extent -9,-9.12 9,10.08, height 3.35
2010T1A250V [mm]
  round 1.8 hole 1 paste+0 mask+0.051: 1(-2.54,0) 2(2.54,0)
  silkscreen extent -4.25,-2 4.25,2, body extent -4.25,-2 4.25,2, height 8.5
1715747 [mm]
  rect 2.5x2.5 / inner round 2.5 / far side rect 2.5x2.5 hole 1.3: 1(-7.62,0)
  round 2.5 hole 1.3: 2(-2.54,0) 3(2.54,0) 4(7.62,0)
  silkscreen extent -10.16,-4.6 10.16,5.2, body extent -10.7,-4.62 10.19,5.21, height 14.2
AFC07-S40ECA-00 [mm]
  rect 0.3x1.2 smd paste+0 mask+0.051: 1(-9.751,1.318) 2(-9.252,1.318) 3(-8.753,1.318) 4(-8.253,1.318) 5(-7.752,1.318) 6(-7.252,1.318) 7(-6.751,1.318) 8(-6.251,1.318) 9(-5.753,1.318) 10(-5.253,1.318) 11(-4.752,1.318) 12(-4.252,1.318) 13(-3.752,1.318) 14(-3.251,1.318) 15(-2.752,1.318) 16(-2.253,1.318) 17(-1.753,1.318) 18(-1.252,1.318) 19(-0.752,1.318) 20(-0.252,1.318) 21(0.249,1.318) 22(0.748,1.318) 23(1.247,1.318) 24(1.747,1.318) 25(2.248,1.318) 26(2.748,1.318) 27(3.249,1.318) 28(3.749,1.318) 29(4.247,1.318) 30(4.747,1.318) 31(5.248,1.318) 32(5.748,1.318) 33(6.248,1.318) 34(6.749,1.318) 35(7.248,1.318) 36(7.747,1.318) 37(8.247,1.318) 38(8.748,1.318) 39(9.248,1.318) 40(9.748,1.318)
  rect 2.2x3.3 smd paste+0 mask+0.051: MP1(-11.35,-1.318) MP2(11.35,-1.318)
  silkscreen extent -12.85,-4.12 12.87,1.38, body extent -12.8,-4.04 12.8,1.71, height 2.01
B3F-4055 [mm]
  round 2.3 hole 1.3 paste+0 mask+0.051: 1(6.25,-2.5) 2(-6.25,-2.5) 3(6.25,2.5) 4(-6.25,2.5)
  round 0 hole 1.8 unplated paste+0 mask+0.051: MH(0,-4.5) MH(0,4.5)
  silkscreen extent -5.99,-6 6.6,6, body extent -7.05,-6 7.05,6, height 8.52
Cap-0603 [mil]
  rect 30x35 smd mask+2.36: 1(-30,0) 2(30,0)
  silkscreen extent -49,-21 49,21, body extent -32,-16 31,16, height 34
Cap-1206 [mil] "SMD 1206"
  rect 60x70 smd: 1(-50,0) 2(50,0)
  silkscreen extent -84,-39 84,39, body extent -63,-31 63,32, height 39
Case-B [mm]
  rect 1.7x3 smd paste+0: 1(-1.7,0) 2(1.7,0)
  silkscreen extent -3.35,-1.63 2.03,1.63, body extent -1.85,-1.5 1.85,1.5, height 2.16
DB128L-5.08-2P-BK-S [mm]
  rect 3x3 hole 1.6: 1(-2.54,0)
  round 3 hole 1.6: 2(2.54,0)
  silkscreen extent -5.13,-5.08 5.13,5.13, body extent -5.08,-5.03 5.13,5.07, height 10.3
fuse-0603 [mm]
  rect 1x1 smd: 1(-0.85,0) 2(0.85,0)
  silkscreen extent -0.25,-0.48 0.25,0.48, body extent -0.77,-0.42 0.78,0.43, height 0.45
Fuse-0805 [mm]
  rect 1x1.7 smd: 1(-1.1,0) 2(1.1,0)
  silkscreen extent -0.41,-0.81 0.41,0.81, body extent -1.1,-0.75 1.1,0.75, height 1.24
HDR1X2_ [mm] "CONN HEADER VERT 2POS 2.54MM"
  rect 1.5x1.5 hole 0.9: 1(0,0)
  round 1.5 hole 0.9: 2(2.54,0)
  silkscreen extent -1.27,-1.27 3.81,1.27, body extent -1.27,-1.27 3.81,1.27, height 8.44
"IND-0603 (1608 Metric)" [mm] "0.063\" L x 0.032\" W (1.60mm x 0.80mm)"
  rect 0.6x0.8 smd: 1(-0.7,0) 2(0.7,0)
  silkscreen extent -0.2,-0.46 0.23,0.46, body extent -0.8,-0.4 0.8,0.4, height 0.78
KF28C-7.62-2P [mm]
  rect 2.5x2.5 hole 1.6: 1(-3.81,0)
  round 2.5 hole 1.6: 2(3.81,0)
  silkscreen extent -9.19,-5.69 9.22,6.68, body extent -9.06,-6.65 9.06,7.45, height 17.6
KF58C-10.0-2P [mm]
  rect 3x3 hole 1.8: 1(-5,0)
  round 3 hole 1.8: 2(5,0)
  silkscreen extent -11.63,-6.3 11.63,7.11, body extent -11.5,-7.35 11.5,8.15, height 19.5
KF78C-13.0-2P [mm]
  rect 4x4 hole 2.6 paste+0 mask+0.051: 1(-6.5,0)
  round 4 hole 2.6 paste+0 mask+0.051: 2(6.5,0)
  silkscreen extent -14.5,-9.1 14.5,9.1, body extent -14.5,-10.25 14.5,10.25, height 22
KF88SA-16.0-2P [mm]
  rect 8x4 hole 1.8 slot 5.5 at 0 deg: 1(-8,-4.5) 1(-8,4.5)
  oval 8x4 hole 1.8 slot 5.5 at 0 deg: 2(8,-4.5) 2(8,4.5)
  silkscreen extent -17.83,-10.63 17.83,10.63, body extent -17.7,-10.5 17.7,10.5, height 26.9
LHE10-20D0512-02 [mm]
  round 3 hole 1.5: 1(-23.5,17.5) 2(-23.5,0) 3(-23.5,-17.5)
  oval 3x2.5 hole 1.5: 4(23.5,-10) 5(23.5,-5) 7(23.5,5) 8(23.5,10)
  silkscreen extent -27.75,-22.75 27.75,22.75, body extent -27.5,-22.5 27.5,22.5, height 21
MWSA0402S-4R7MT [mm]
  rect 1.5x2.5 smd: 1(-1.85,0) 2(1.85,0)
  silkscreen extent -2.2,-2.1 2.2,2.1
Res-0402 [mil]
  rect 18x25 smd mask+2.17: 1(-18.5,0) 2(18.5,0)
  silkscreen extent -32,-17 32,16, body extent -23,-11 23,11, height 16
Res-0603 [mil]
  rect 30x35 smd: 1(-30,0) 2(30,0)
  silkscreen extent -48,-21 48,21, body extent -31,-17 31,17, height 18
Res-1206 [mil]
  rect 60x70 smd: 1(-50,0) 2(50,0)
  silkscreen extent -84,-39 84,39, body extent -63,-31 63,31, height 24
RVT1H470M0607 [mm]
  rect 3.5x1.6 smd: 1(-2.8,0) 2(2.8,0)
  silkscreen extent -4.27,-3.33 3.32,3.33, body extent -3.31,-3.33 3.29,3.27, height 7.94
SC70-5 [mm]
  rect 0.85x0.35 smd: 1(-1.1,0.65) 2(-1.1,0) 3(-1.1,-0.65) 4(1.1,-0.65) 5(1.1,0.65)
  silkscreen extent -1.8,-1.07 0.64,1.07, body extent -1.05,-1 1.05,1, height 1.1
SLA-05VDC-SL-A [mm]
  round 3.5 hole 2.2 paste+0 mask+0.051: 2(8.9,7.6) 5(-8.9,5.1)
  round 2.5 hole 1.2 paste+0 mask+0.051: 3(5.1,-7.6) 4(-5.1,-7.6)
  silkscreen extent -13.8,-14.05 13.73,17.9, body extent -13.85,-14.05 13.75,17.96, height 20.4
SMA [mm]
  rect 2.5x1.7 smd: 1(-2,0) 2(2,0)
  silkscreen extent -4.44,-1.42 2.06,1.42, body extent -2.6,-1.3 2.6,1.3, height 2.4
"SMA Bi Directional" [mm]
  rect 2x1.8 smd paste+0 mask+0.051: 1(-2,0) 2(2,0)
  silkscreen extent -2.3,-1.4 2.3,1.4, body extent -2.6,-1.3 2.6,1.3, height 2.4
SMB_ [mm]
  rect 2.8x2.4 smd: 1(-2.3,0) 2(2.3,0)
  silkscreen extent -2.21,-1.91 4.83,1.9, body extent -2.7,-1.8 2.7,1.8, height 2.3
SOD-123 [mm]
  rect 0.95x0.9 smd: 1(-1.575,0) 2(1.575,0)
  silkscreen extent -1.37,-0.8 2.82,0.8, body extent -1.82,-0.78 1.83,0.78, height 1.5
SOD-323 [mm]
  rect 0.8x0.9 smd mask+0.055: 1(-1.15,0) 2(1.15,0)
  silkscreen extent -2,-0.79 0.94,0.78, body extent -1.3,-0.67 1.3,0.67, height 1.1
SOP-8 [mm]
  rect 1.3x0.7 smd: 1(-2.75,1.905) 2(-2.75,0.635) 3(-2.75,-0.635) 4(-2.75,-1.905) 5(2.75,-1.905) 6(2.75,-0.635) 7(2.75,0.635) 8(2.75,1.905)
  silkscreen extent -3.69,-2.57 2.03,2.57, body extent -3.1,-2.5 3.1,2.5, height 1.76
SOT-23 [mm] "TRANS NPN 40V 0.6A SOT23"
  rect 0.82x0.92 smd: 1(-0.95,-1) 2(0.95,-1) 3(0,1)
  silkscreen extent -1.68,-1.3 1.55,0.81, body extent -1.5,-1.25 1.5,1.25, height 1.05
SOT-723 [mm]
  rect 0.5x0.45 smd: 1(-0.4,-0.575) 2(0.4,-0.575) 3(0,0.575)
  silkscreen extent -0.94,-0.66 0.64,0.64, body extent -0.6,-0.6 0.6,0.6, height 0.5
"SOT- 223" [mm]
  rect 1.5x2 smd: 1(-2.3,-3.05) 2(0,-3.05) 3(2.3,-3.05)
  rect 3.8x2 smd: 4(0,3.05)
  silkscreen extent -3.35,-3.2 3.3,1.8, body extent -3.25,-3.5 3.25,3.5, height 1.61
SRA-05VDC-CL [mm]
  rect 2.5x2.5 hole 1.6: 1(0,0)
  round 2.5 hole 1.6: 2(0,10) 3(-10.2,10) 4(-10.2,0) 5(-12.7,5)
  silkscreen extent -14.23,-1.64 1.87,11.28, body extent -14.18,-1.2 1.82,11.21, height 15.2
SRD-05VDC-SL-C [mil]
  round 110 hole 60 paste+0 mask+2: 1(-200.79,-236.22) 2(279.52,-236.2) 3(279.53,236.2) 4(-200.79,236.22) 5(-279.53,0)
  silkscreen extent -342,-307 413,307, body extent -343,-307 413,307, height 642
SSOP-28-208mil [mm]
  rect 1.85x0.45 smd: 1(-3.4,4.225) 2(-3.4,3.575) 3(-3.4,2.925) 4(-3.4,2.275) 5(-3.4,1.625) 6(-3.4,0.975) 7(-3.4,0.325) 8(-3.4,-0.325) 9(-3.4,-0.975) 10(-3.4,-1.625) 11(-3.4,-2.275) 12(-3.4,-2.925) 13(-3.4,-3.575) 14(-3.4,-4.225) 15(3.4,-4.225) 16(3.4,-3.575) 17(3.4,-2.925) 18(3.4,-2.275) 19(3.4,-1.625) 20(3.4,-0.975) 21(3.4,-0.325) 22(3.4,0.325) 23(3.4,0.975) 24(3.4,1.625) 25(3.4,2.275) 26(3.4,2.925) 27(3.4,3.575) 28(3.4,4.225)
  silkscreen extent -4.34,-5.21 2.72,5.21, body extent -3.88,-5.17 3.88,5.17, height 2.15
T44001 [mm]
  round 2.9 hole 1.9 paste+0 mask+0.051: 1(-2.5,-3.6) 1(-2.5,3.6) 1(2.5,-3.6) 1(2.5,3.6)
  silkscreen extent -4,-4 4,4, body extent -4.1,-4.1 4.1,4.1, height 9.93
"Test-point - 0.5mm" [mm]
  oct 1x1 smd: 1(0,0)
  silkscreen extent -0.68,-0.68 0.68,0.68
TS-1109S-C-B [mm]
  rect 1.4x1.1 smd: 1(-3.25,-1.5) 2(3.25,-1.5) 3(3.25,1.5) 4(-3.25,1.5)
  silkscreen extent -2.41,-2.31 2.41,2.31, body extent -3.5,-2.25 3.5,2.25, height 4.3
TYPE-C-31-M-12_ [mm]
  rect 0.6x1.2 smd: A1/B12(-3.2,2.375) A4/B9(-2.4,2.375) B1/A12(3.2,2.375) B4/A9(2.4,2.375)
  rect 0.3x1.2 smd: A5(-1.25,2.375) A6(-0.25,2.375) A7(0.25,2.375) A8(1.25,2.375) B5(1.75,2.375) B6(0.75,2.375) B7(-0.75,2.375) B8(-1.75,2.375)
  round 0 hole 0.62 unplated: MH(-2.89,1.305) MH(2.89,1.305)
  oval 0.9x2 hole 0.6 slot 1.7 at 90 deg: S1(4.325,1.805) S4(-4.325,1.805)
  oval 0.9x1.7 hole 0.6 slot 1.4 at 90 deg: S2(4.325,-2.375) S3(-4.325,-2.375)
  silkscreen extent -4.5,-3.57 4.5,0.44, body extent -4.47,-5.01 4.47,2.89, height 3.31
V300LT20AP [mm]
  round 1.8 hole 1.2 paste+0 mask+0.051: 1(-3.75,2.45) 2(3.75,-2.45)
  silkscreen extent -6.31,-2.45 6.26,2.45, body extent -6.25,-3.31 6.25,3.3, height 13.85
"Voltlink Target" [mm]
  rect 0.5x1.6 smd: 1(-2.5,-1.262) 2(-1.5,-1.262) 3(-0.5,-1.262) 4(0.5,-1.262) 5(1.5,-1.262) 6(2.5,-1.262)
  rect 1.2x1.8 smd: MP1(-3.8,1.262) MP2(3.8,1.262)
  silkscreen extent -4.06,-1.68 4.06,2.17, body extent -4,-1.49 4,2.11, height 4.25
VSSOP-8(3.1x2.1) [mm]
  rect 0.8x0.3 smd mask+0.05: 1(-1.55,0.75) 2(-1.55,0.25) 3(-1.55,-0.25) 4(-1.55,-0.75) 5(1.55,-0.75) 6(1.55,-0.25) 7(1.55,0.25) 8(1.55,0.75)
  silkscreen extent -2.24,-1.04 1.07,1.04, body extent -1.55,-1 1.55,1, height 0.88
VSSOP-10 [mm]
  rect 1.45x0.3 smd paste+0 mask+0.05: 1(-2.2,1) 2(-2.2,0.5) 3(-2.2,0) 4(-2.2,-0.5) 5(-2.2,-1) 6(2.2,-1) 7(2.2,-0.5) 8(2.2,0) 9(2.2,0.5) 10(2.2,1)
  silkscreen extent -3.17,-1.55 1.47,1.55, body extent -2.45,-1.5 2.45,1.5, height 1.07
X2-SON-3(0.6x1.3). [mm]
  rect 0.2x0.2 smd paste+0 mask+0.05: 1(-0.125,0) 2(0.125,-0.5) 3(0.125,0.5)
  silkscreen extent -0.66,-0.7 0.38,0.7, body extent -0.31,-0.65 0.31,0.65, height 0.4

## Part data
C1: library part 25SVPF100M, "CAP ALUM POLY 100UF 20% 25V SMD", Case/Package=Radial, ESR (Equivalent Series Resistance)=24mR, LCSC Part Number=C136279, Leakage Current=500uA, Manufacturer=Panasonic, Max Operating Temperature=105°C, Min Operating Temperature=-55°C, Package Quantity=1000, Ripple Current=3.2A, Supplier Part Number 1=P123675CT-ND, Tolerance=20%, Voltage=25V, Capacitance=100uF, Category="Aluminum Electrolytic Capacitors", ComponentLink1Description=https://datasheet.ciiva.com/25746/1734360-25746518.pdf?src-supplier=Farnell, ComponentLink1URL=https://datasheet.ciiva.com/25746/1734360-25746518.pdf?src-supplier=Farnell, ComponentLink2Description=https://datasheet.ciiva.com/22746/1734360-22746213.pdf?src-supplier=Element14, ComponentLink2URL=https://datasheet.ciiva.com/22746/1734360-22746213.pdf?src-supplier=Element14, ComponentLink3Description=https://datasheet.ciiva.com/24064/svpf-os-262415-24064540.pdf?src-supplier=Mouser, ComponentLink3URL=https://datasheet.ciiva.com/24064/svpf-os-262415-24064540.pdf?src-supplier=Mouser, Diameter=8mm, Dissipation Factor=12%, Height=6.9mm, Height - Seated (Max)=0.276inch, Item Type=Capacitor, Lead Free="Lead Free", Length=6.9mm, Life (Hours)=5000Hour, Manufacturer Part Number=25SVPF100M, Mount="Surface Mount", Number of Pins=7, Packaging="Tape and Reel", Pricing 1="1=1.68000, 10=1.32800, 50=1.15080, 100=0.99590, 500=0.75246 (USD)", Reach SVHC Compliant=Yes, Ripple Current (AC)=3.2A, RoHS=Yes, RoHS Compliant=Yes, Series="OS-CON, SVPF", Stock 1=5809, Supplier 1=Digi-Key, Termination=SMD/SMT, Voltage Rating=25V, Voltage Rating (DC)=25V
C2 C4 C7 C10 C12 C14 C15 C16 C17 C21 C22 C23 C24 C25 C26 C27 C28 C29 C30 C31 C32 C33 C34 C35 C36 C37 C38 C39 C40 C41: library part CC0603KRX5R9BB104, "CAP CER 0.1UF 50V X5R 0603", Case Code (Imperial)=0603, Case Code (Metric)=1608, Dielectric=X5R, LCSC Part Number=C110022, Manufacturer=Yageo, Max Operating Temperature=85°C, Min Operating Temperature=-55°C, Package Quantity=4000, Supplier Part Number 1=311-4046-1-ND, Tolerance=10%, Voltage Rating=50V, Capacitance=100nF, Case/Package=0603, Category="Ceramic Capacitors", ComponentLink1Description=http://www.mouser.com/ds/2/447/Yageo_UPY-GP_NP0_16V-to-50V_9-358835.pdf?src-supplier=Mouser, ComponentLink1URL=http://www.mouser.com/ds/2/447/Yageo_UPY-GP_NP0_16V-to-50V_9-358835.pdf?src-supplier=Mouser, ComponentLink2Description=https://www.yageo.com/upload/media/product/productsearch/datasheet/mlcc/UPY-GPHC_X5R_4V-to-50V_26.pdf?src-supplier=Digi-Key, ComponentLink2URL=https://www.yageo.com/upload/media/product/productsearch/datasheet/mlcc/UPY-GPHC_X5R_4V-to-50V_26.pdf?src-supplier=Digi-Key, ComponentLink3Description=http://www.yageo.com/exep/pages/download/literatures/ProductSelectionGuide%202014_Final_2.pdf?src-supplier=Digi-Key, ComponentLink3URL=http://www.yageo.com/exep/pages/download/literatures/ProductSelectionGuide%202014_Final_2.pdf?src-supplier=Digi-Key, Halogen Free="Halogen Free", Item Type=Capacitor, Lead Free="Lead Free", Length=0.063inch, Manufacturer Part Number=CC0603KRX5R9BB104, Mount="Surface Mount", Packaging="Tape and Reel", Pricing 1="1=0.10000, 10=0.05200, 50=0.02820, 100=0.02310, 500=0.01648, 1000=0.01294 (USD)", RoHS=Yes, Stock 1=152253, Supplier 1=Digi-Key, Termination=SMD/SMT, Thickness=0.035inch, Voltage Rating (DC)=50V, Weight=7.1E-05oz, Width=0.031inch
C3 C9: library part RVT1H470M0607, "47uF 50V 66mA@120Hz ±20% SMD,D6.3xL7.7mm Aluminum Electrolytic Capacitors - SMD ROHS", LCSC Part Number=C72523, Manufacturer=ROQANG, Package=SMD,D6.3xL7.7mm, ComponentLink1Description=LCSC, ComponentLink1URL=https://www.lcsc.com/product-detail/Aluminum-Electrolytic-Capacitors-SMD_ROQANG-RVT1H470M0607_C72523.html, Item Type=Capacitor, Manufacturer Part Number=RVT1H470M0607
C5: library part TAJB226K016RNJ, "CAP TANT 22UF 10% 16V 1411", LCSC Part Number=C8020, Manufacturer="Kyocera AVX", Package=CASE-B-3528, ComponentLink1Description=LCSC, ComponentLink1URL=https://www.lcsc.com/product-detail/Tantalum-Capacitors_Kyocera-AVX-TAJB226K016RNJ_C8020.html, Item Type="Tantalum Capacitor", Manufacturer Part Number=TAJB226K016RNJ
C6 C11: library part CC0603MRX5R6BB226, "CAP CER 22UF 10V X5R 0603", Case Code (Imperial)=0603, Case Code (Metric)=1608, Dielectric=X5R, LCSC Part Number=C109447, Manufacturer=Yageo, Max Operating Temperature=85°C, Min Operating Temperature=-55°C, Package Quantity=4000, Supplier Part Number 1=311-1819-1-ND, Tolerance=20%, Voltage Rating=10V, Capacitance=22uF, Case/Package=0603, Category="Ceramic Capacitors", ComponentLink1Description=http://www.mouser.com/ds/2/447/Yageo_UPY-GP_NP0_16V-to-50V_9-358835.pdf?src-supplier=Mouser, ComponentLink1URL=http://www.mouser.com/ds/2/447/Yageo_UPY-GP_NP0_16V-to-50V_9-358835.pdf?src-supplier=Mouser, ComponentLink2Description=http://www.yageo.com/documents/recent/UPY-GPHC_X5R_4V-to-50V_25.pdf?src-supplier=Digi-Key, ComponentLink2URL=http://www.yageo.com/documents/recent/UPY-GPHC_X5R_4V-to-50V_25.pdf?src-supplier=Digi-Key, Halogen Free="Halogen Free", Height=0.8mm, Item Type=Capacitor, Lead Free="Lead Free", Length=0.063inch, Manufacturer Part Number=CC0603MRX5R6BB226, Mount="Surface Mount", Packaging="Tape and Reel", Pricing 1="1=0.68000, 10=0.48000, 50=0.36300, 100=0.31610, 500=0.23416, 1000=0.19903 (USD)", RoHS=Yes, RoHS Compliant=Yes, Stock 1=19628, Supplier 1=Digi-Key, Termination=SMD/SMT, Thickness=0.035inch, Voltage Rating (DC)=10V, Weight=7.1E-05oz, Width=0.8mm
C8 C19: library part CL10A105KB8NNNC, "CAP CER 1UF 50V X5R 0603", Case Code (Imperial)=0603, Case Code (Metric)=1608, Dielectric=X5R, LCSC Part Number=C15849, Manufacturer=Samsung, Max Operating Temperature=85°C, Min Operating Temperature=-55°C, Tolerance=10%, Voltage Rating=50V, Case/Package=0603, Category="Ceramic Capacitors", ComponentLink1Description=https://datasheet.ciiva.com/26877/getdatasheetpartid-753736-26877879.pdf?src-supplier=Verical, ComponentLink1URL=https://datasheet.ciiva.com/26877/getdatasheetpartid-753736-26877879.pdf?src-supplier=Verical, Depth=0.8mm, Item Type=Capacitor, Length=1.6mm, Manufacturer Part Number=CL10A105KB8NNNC, Material=4241ConductorMaterial, Mounting Technology="Surface Mount", Packaging="Tape and Reel", Pricing="4000=0.01632, 8000=0.01595, 16000=0.01557, 24000=0.0152, 32000=0.01482 (USD)", Radiation Hardening=No, RoHS=Yes, RoHS Compliant=Yes, Series=CL, Stock=780446, Supplier=Avnet, Supplier Part Number=CL10A105KB8NNNC, Voltage Rating (DC)=50V
C13 C18: library part CC0603KRX5R7BB475, "CAP CER 4.7UF 16V X5R 0603", Case Code (Imperial)=0603, Case Code (Metric)=1608, Dielectric=X5R, LCSC Part Number=C277476, Manufacturer=Yageo, Max Operating Temperature=85°C, Min Operating Temperature=-55°C, Resistor Type=Ceramic, Supplier Part Number 1=311-1785-1-ND, Tolerance=10%, Voltage Rating=16V, Capacitance=4.7uF, Case/Package=0603, Category="Ceramic Capacitors", ComponentLink1Description=http://www.mouser.com/ds/2/447/UPY-GPHC_X5R_4V-to-50V_25-1131599.pdf?src-supplier=Mouser, ComponentLink1URL=http://www.mouser.com/ds/2/447/UPY-GPHC_X5R_4V-to-50V_25-1131599.pdf?src-supplier=Mouser, ComponentLink2Description=http://www.yageo.com/documents/recent/UPY-GPHC_X5R_4V-to-50V_25.pdf?src-supplier=Digi-Key, ComponentLink2URL=http://www.yageo.com/documents/recent/UPY-GPHC_X5R_4V-to-50V_25.pdf?src-supplier=Digi-Key, Depth=0.8mm, Halogen Free="Halogen Free", Height=0.8mm, Item Type=Capacitor, Lead Free="Lead Free", Length=1.6mm, Manufacturer Part Number=CC0603KRX5R7BB475, Mount="Surface Mount", Packaging="Tape and Reel", Pricing 1="1=0.20000, 10=0.13800, 50=0.08280, 100=0.06990, 500=0.04784, 1000=0.04233 (USD)", RoHS=Yes, RoHS Compliant=Yes, Series=CC, Stock 1=547703, Supplier 1=Digi-Key, Termination=SMD/SMT, Thickness=0.037inch, Voltage Rating (DC)=16V, Weight=7.1E-05oz, Width=0.8mm
C20: library part CC1206KKX7RCBB472, "CAP CER 4700PF 1KV X7R 1206", Case Code (Imperial)=1206, Case Code (Metric)=3216, Dielectric=X7R, Dielectric Material=Ceramic, LCSC Part Number=C107198, Manufacturer=Yageo, Max Operating Temperature=125°C, Min Operating Temperature=-55°C, Supplier Part Number 1=7130131, Tolerance=10%, Voltage Rating=1kV, Capacitance=4.7nF, Case/Package=1206, Category="Ceramic Capacitors", ComponentLink1Description=https://datasheet.ciiva.com/13208/upy-gp-np0-16v-to-50v-8-13208693.pdf?src-supplier=Mouser, ComponentLink1URL=https://datasheet.ciiva.com/13208/upy-gp-np0-16v-to-50v-8-13208693.pdf?src-supplier=Mouser, ComponentLink2Description=https://datasheet.ciiva.com/11466/hv-11466701.pdf?src-supplier=Avnet, ComponentLink2URL=https://datasheet.ciiva.com/11466/hv-11466701.pdf?src-supplier=Avnet, Depth=1.6mm, Item Type=Capacitor, Lead Free="Lead Free", Length=3.2mm, Manufacturer Part Number=CC1206KKX7RCBB472, Mount="Surface Mount", Number of Pins=2, Packaging="Tape and Reel", Pricing 1="3000=0.02860, 9000=0.02750, 15000=0.02700, 45000=0.02600, 75000=0.02510 (USD)", Radiation Hardening=No, Resistor Type=Ceramic, RoHS=Yes, RoHS Compliant=Yes, Series=CC, Stock 1=180000, Supplier 1="Future Electronics", Termination=SMD/SMT, Thickness=0.057inch, Voltage Rating (DC)=1kV, Weight=0.000571oz, Width=0.063inch
D1: "50A 600W 12V 7.78V 7V SMB Electrostatic and Surge Protection (TVS/ESD) ROHS", LCSC Part Number=C3019967, Manufacturer=Slkor, Package=SMB, ComponentLink1Description=LCSC, ComponentLink1URL=https://www.lcsc.com/product-detail/Electrostatic-and-Surge-Protection-TVS-ESD_Slkor-SLKORMICRO-Elec-SMBJ7-0A_C3019967.html, Item Type=(TVS/ESD), Manufacturer Part Number=SMBJ7.0A
D2: "18.5A 32.4V 22.2V 20V DO-214AA Electrostatic and Surge Protection (TVS/ESD) ROHS", LCSC Part Number=C2760886, Manufacturer=Slkor, Package=DO-214AA, ComponentLink1Description=LCSC, ComponentLink1URL=https://www.lcsc.com/product-detail/Electrostatic-and-Surge-Protection-TVS-ESD_Slkor-SLKORMICRO-Elec-SMBJ20A_C2760886.html, Item Type=(TVS/ESD), Manufacturer Part Number=SMBJ20A
D3: "40V 500mV@2A 2A SMA(DO-214AC) Schottky Barrier Diodes (SBD) ROHS", LCSC Part Number=C2886579, Manufacturer="Guangdong Hottech", Package=SMA(DO-214AC), ComponentLink1Description=LCSC, ComponentLink1URL=https://www.lcsc.com/product-detail/Schottky-Barrier-Diodes-SBD_Guangdong-Hottech-SS24A_C2886579.html, Manufacturer Part Number=SS24A
D4: "DIODE SCHOTTKY 40V 250MA SOD323", LCSC Part Number=C152519, Manufacturer="ON Semiconductor", Reverse Voltage=40V, ComponentLink1Description=https://datasheet.ciiva.com/915/nsr0240h-d-915416.pdf?src-supplier=Digikey, ComponentLink1URL=https://datasheet.ciiva.com/915/nsr0240h-d-915416.pdf?src-supplier=Digikey, ComponentLink2Description=https://datasheet.ciiva.com/915/nsr0240h-d-915417.pdf?src-supplier=Digikey, ComponentLink2URL=https://datasheet.ciiva.com/915/nsr0240h-d-915417.pdf?src-supplier=Digikey, ComponentLink3Description=https://datasheet.ciiva.com/915/nsr0240h-d-915418.pdf?src-supplier=Digikey, ComponentLink3URL=https://datasheet.ciiva.com/915/nsr0240h-d-915418.pdf?src-supplier=Digikey, ComponentLink4Description=https://datasheet.ciiva.com/16396/nsr0240h-d-16396521.pdf?src-supplier=Future+Electronics, ComponentLink4URL=https://datasheet.ciiva.com/16396/nsr0240h-d-16396521.pdf?src-supplier=Future+Electronics, Item Type=Diode, Manufacturer Part Number=NSR0240HT1G, Pricing="1=0.272, 25=0.186, 50=0.139, 100=0.091, 250=0.084 (USD)", RoHS=Yes, Stock=6655, Supplier=Avnet
D5: "TVS DIODE 3.6VWM 8.4VC 3X2SON", LCSC Part Number=C1975871, Manufacturer="Texas Instruments", Max Operating Temperature=125°C, Min Breakdown Voltage=5.1V, Min Operating Temperature=-40°C, Peak Pulse Current=2.5A, Peak Pulse Power=20W, Power Line Protection=No, Reverse Standoff Voltage=3.6V, Supplier Part Number=595-ESD122DMYR, Category="Integrated Circuits (ICs)", ComponentLink1Description=http://www.ti.com/general/docs/lit/getliterature.tsp?genericPartNumber=ESD122&fileType=pdf&src-supplier=Farnell, ComponentLink1URL=http://www.ti.com/general/docs/lit/getliterature.tsp?genericPartNumber=ESD122&fileType=pdf&src-supplier=Farnell, ComponentLink2Description=http://www.ti.com/lit/ds/symlink/esd122.pdf?src-supplier=Digikey, ComponentLink2URL=http://www.ti.com/lit/ds/symlink/esd122.pdf?src-supplier=Digikey, ComponentLink3Description=http://www.ti.com/general/docs/suppproductinfo.tsp?distId=10&amp;gotoUrl=http%3A%2F%2Fwww.ti.com%2Flit%2Fgpn%2Fesd122&src-supplier=Digikey, ComponentLink3URL=http://www.ti.com/general/docs/suppproductinfo.tsp?distId=10&amp;gotoUrl=http%3A%2F%2Fwww.ti.com%2Flit%2Fgpn%2Fesd122&src-supplier=Digikey, Diode Type=ZENER, Interface=USB,GPIO,HDMI,PCIe,SATA, Item Type=TVS/ESD, Manufacturer Part Number=ESD122DMYR, Mounting Technology="Surface Mount", Number of Bidirectional Channels=2, Number of Channels=2, Packaging="Cut Tape", Pins=3, Pricing="1=0.38, 10=0.33, 50=0.33, 100=0.252, 1000=0.172, 10000=0.152 (USD)", RoHS=Yes, RoHS Compliant=Yes, Series=-, Stock=137267, Supplier=Mouser
D6 D7 D8 D9: "20.1A 19.9V 13.3V 12V SMA(DO-214AC) Electrostatic and Surge Protection (TVS/ESD) ROHS", LCSC Part Number=C110042, Manufacturer=MDD, Package=SMA(DO-214AC), ComponentLink1Description=LCSC, ComponentLink1URL=https://www.lcsc.com/product-detail/Electrostatic-and-Surge-Protection-TVS-ESD_MDD-Microdiode-Semiconductor-SMAJ12CA_C110042.html, Item Type=(TVS/ESD), Manufacturer Part Number=SMAJ12CA
D10 D11 D12 D13 D14 D15 D16: "DIODE GEN PURP 100V 300MA SOD123", Average Rectified Current=300mA, Current Rating=150mA, Forward Voltage=1.25V, LCSC Part Number=C83528, Manufacturer=Diodes, Max Forward Surge Current (Ifsm)=2A, Max Operating Temperature=150°C, Max Repetitive Reverse Voltage (Vrrm)=100V, Max Reverse Current=1uA, Min Operating Temperature=-65°C, Package Quantity=3000, Power Dissipation=400mW, Supplier Part Number 1=7634694, Voltage Rating (DC)=75V, Category="Rectifier Diodes", ComponentLink1Description=https://datasheet.ciiva.com/1179/1915529-1179304.pdf?src-supplier=Element14, ComponentLink1URL=https://datasheet.ciiva.com/1179/1915529-1179304.pdf?src-supplier=Element14, ComponentLink2Description=https://datasheet.ciiva.com/22695/1915529-22695239.pdf?src-supplier=Element14, ComponentLink2URL=https://datasheet.ciiva.com/22695/1915529-22695239.pdf?src-supplier=Element14, ComponentLink3Description=https://datasheet.ciiva.com/8300/ds30086-8300392.pdf?src-supplier=Avnet, ComponentLink3URL=https://datasheet.ciiva.com/8300/ds30086-8300392.pdf?src-supplier=Avnet, ComponentLink4Description=https://datasheet.ciiva.com/15219/getdatasheetpartid-110030-15219548.pdf?src-supplier=Verical, ComponentLink4URL=https://datasheet.ciiva.com/15219/getdatasheetpartid-110030-15219548.pdf?src-supplier=Verical, ComponentLink5Description=https://datasheet.ciiva.com/8303/ds30086-8303197.pdf?src-supplier=Avnet, ComponentLink5URL=https://datasheet.ciiva.com/8303/ds30086-8303197.pdf?src-supplier=Avnet, ComponentLink6Description=https://datasheet.ciiva.com/911/ds30086-911735.pdf?src-supplier=Digi-Key, ComponentLink6URL=https://datasheet.ciiva.com/911/ds30086-911735.pdf?src-supplier=Digi-Key, ComponentLink7Description=https://datasheet.ciiva.com/911/ds30086-911736.pdf?src-supplier=Digi-Key, ComponentLink7URL=https://datasheet.ciiva.com/911/ds30086-911736.pdf?src-supplier=Digi-Key, ComponentLink8Description=https://datasheet.ciiva.com/911/ds30086-911734.pdf?src-supplier=Digi-Key, ComponentLink8URL=https://datasheet.ciiva.com/911/ds30086-911734.pdf?src-supplier=Digi-Key, ComponentLink9Description=https://datasheet.ciiva.com/4435/ds30086-4435128.pdf?src-supplier=Mouser, ComponentLink9URL=https://datasheet.ciiva.com/4435/ds30086-4435128.pdf?src-supplier=Mouser, Contact Plating=Tin,Matte, Element Configuration=Single, Forward Current=150mA, Height=1.25mm, Item Type=Diode, Lead Free="Lead Free", Length=2.85mm, Manufacturer Part Number=1N4148W-7-F, Max Reverse Voltage (DC)=100V, Max Surge Current=2A, Mounting Technology="Surface Mount", Output Current=150mA, Packaging="Tape and Reel", Peak Non-Repetitive Surge Current=2A, Pins=2, Polarity=Standard, Power Rating=400mW, Pricing 1="3000=0.01840, 12000=0.01760, 45000=0.01690, 120000=0.01640, 300000=0.01560 (USD)", Radiation Hardening=No, Reach SVHC Compliant=Yes, Recovery Time=4ns, Reverse Recovery Time=4ns, Reverse Recovery Time-Max=4ns, RoHS=Yes, RoHS Compliant=Yes, Series=-, Stock 1=32931000, Supplier 1="Future Electronics", Voltage=100V, Weight=0.000353oz, Width=1.7mm
F1: "1A Plugin Fuses ROHS", LCSC Part Number=C354900, Manufacturer="Walter Elec", Package=Plugin, ComponentLink1Description=LCSC, ComponentLink1URL=https://www.lcsc.com/product-detail/Fuses_Walter-Elec-2010T1A250V_C354900.html, Item Type=Fuse, Manufacturer Part Number=2010T1A250V
F2: "6V 1A 50A 1W -40℃~+85℃ 2A 9mΩ 0.5s 80mΩ 0603 Resettable Fuses ROHS", LCSC Part Number=C2757929, Manufacturer=BHFUSE, Package=0603, ComponentLink1Description=LCSC, ComponentLink1URL=https://lcsc.com/product-detail/Resettable-Fuses_BHFUSE-BSMD0603L-100_C2757929.html, Item Type=Fuse, Manufacturer Part Number=BSMD0603L-100
F3 F4 F5 F6: "9V 200mA 100A 500mA 0805 Resettable Fuses ROHS", LCSC Part Number=C20976, Manufacturer=RUILON, Package=0805, ComponentLink1Description=LCSC, ComponentLink1URL=https://www.lcsc.com/product-detail/Resettable-Fuses_RUILON-Shenzhen-Ruilongyuan-Elec-SMD0805P020TF_C20976.html, Item Type=Fuse, Manufacturer Part Number=SMD0805P020TF